# Altium PCB Digit_output_Ext.PcbDoc
Units mm, origin at the board's own origin, x right, y up, seen from the top; angles counter-clockwise.
Board outline 30 x 35 mm, 2 copper layers (Top Layer, Bottom Layer); 31 components, 13 nets, 68 pads, 22 vias.
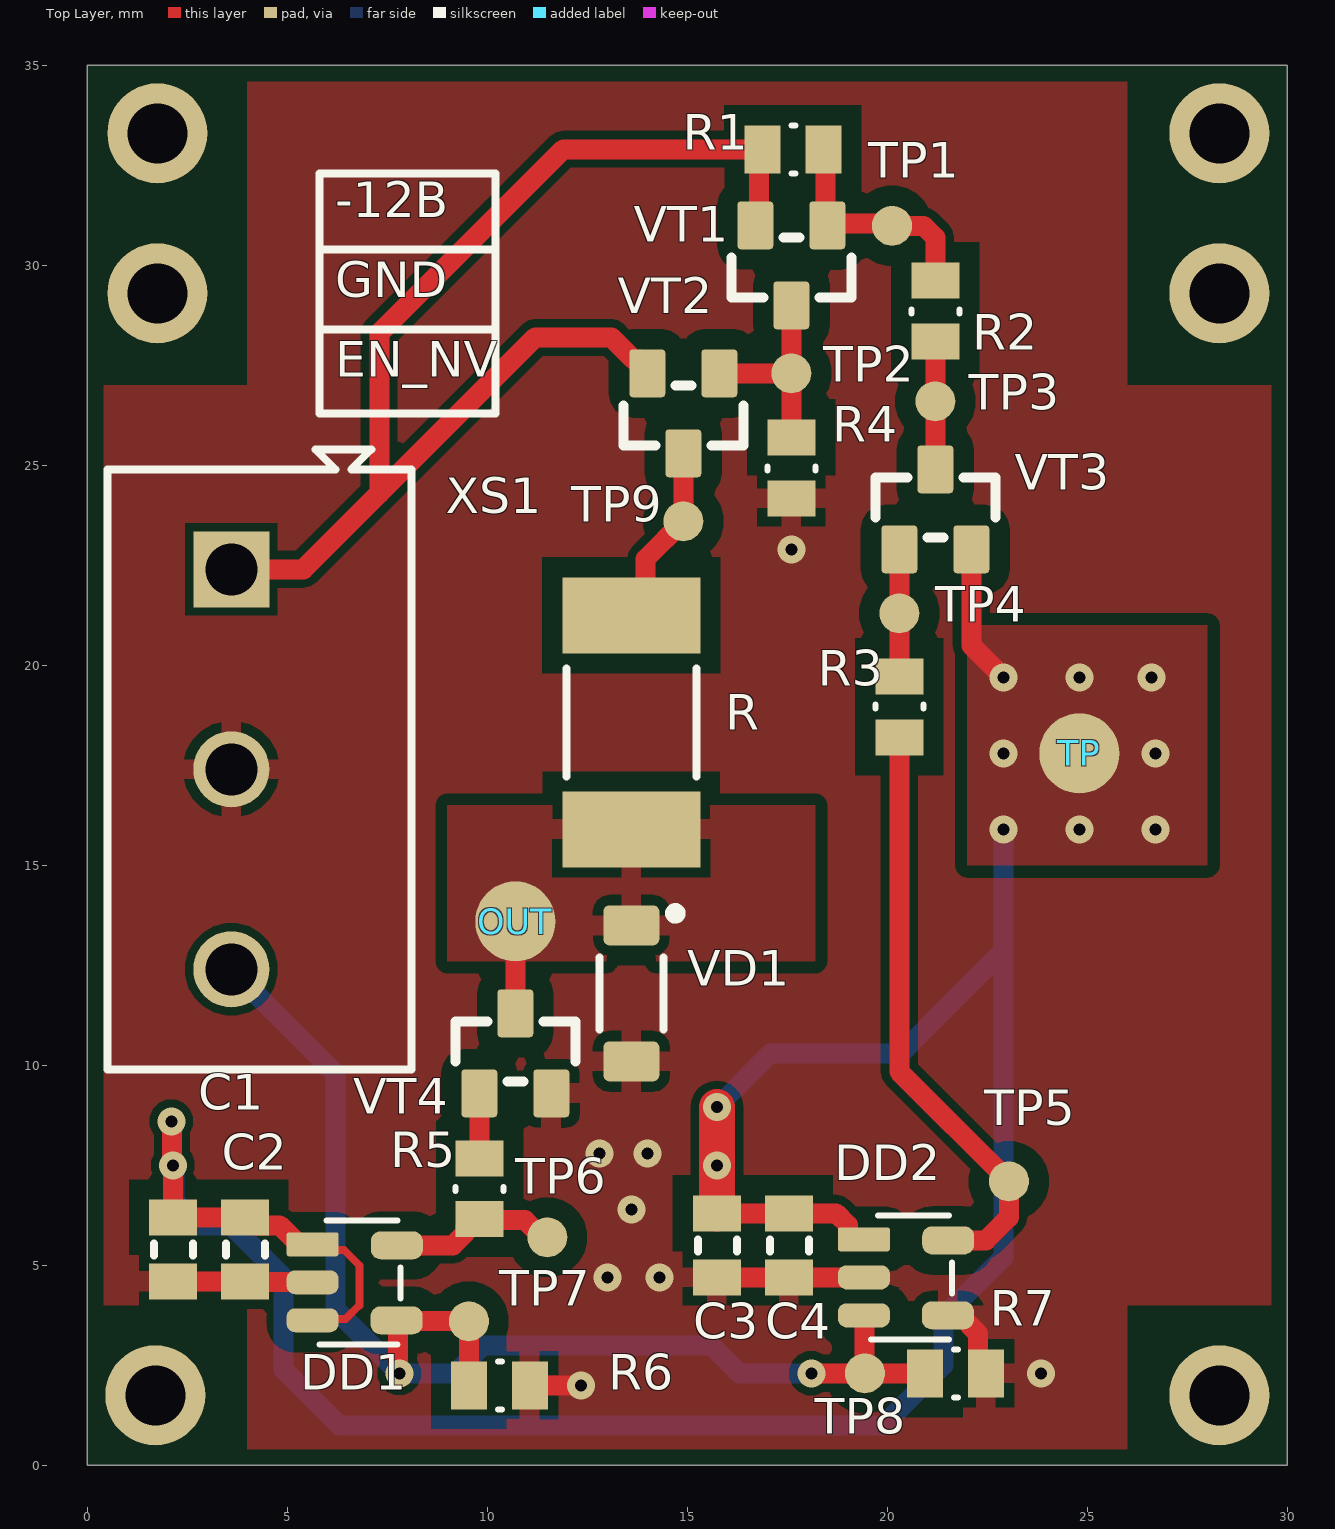
[diagram p0: Top Layer view]
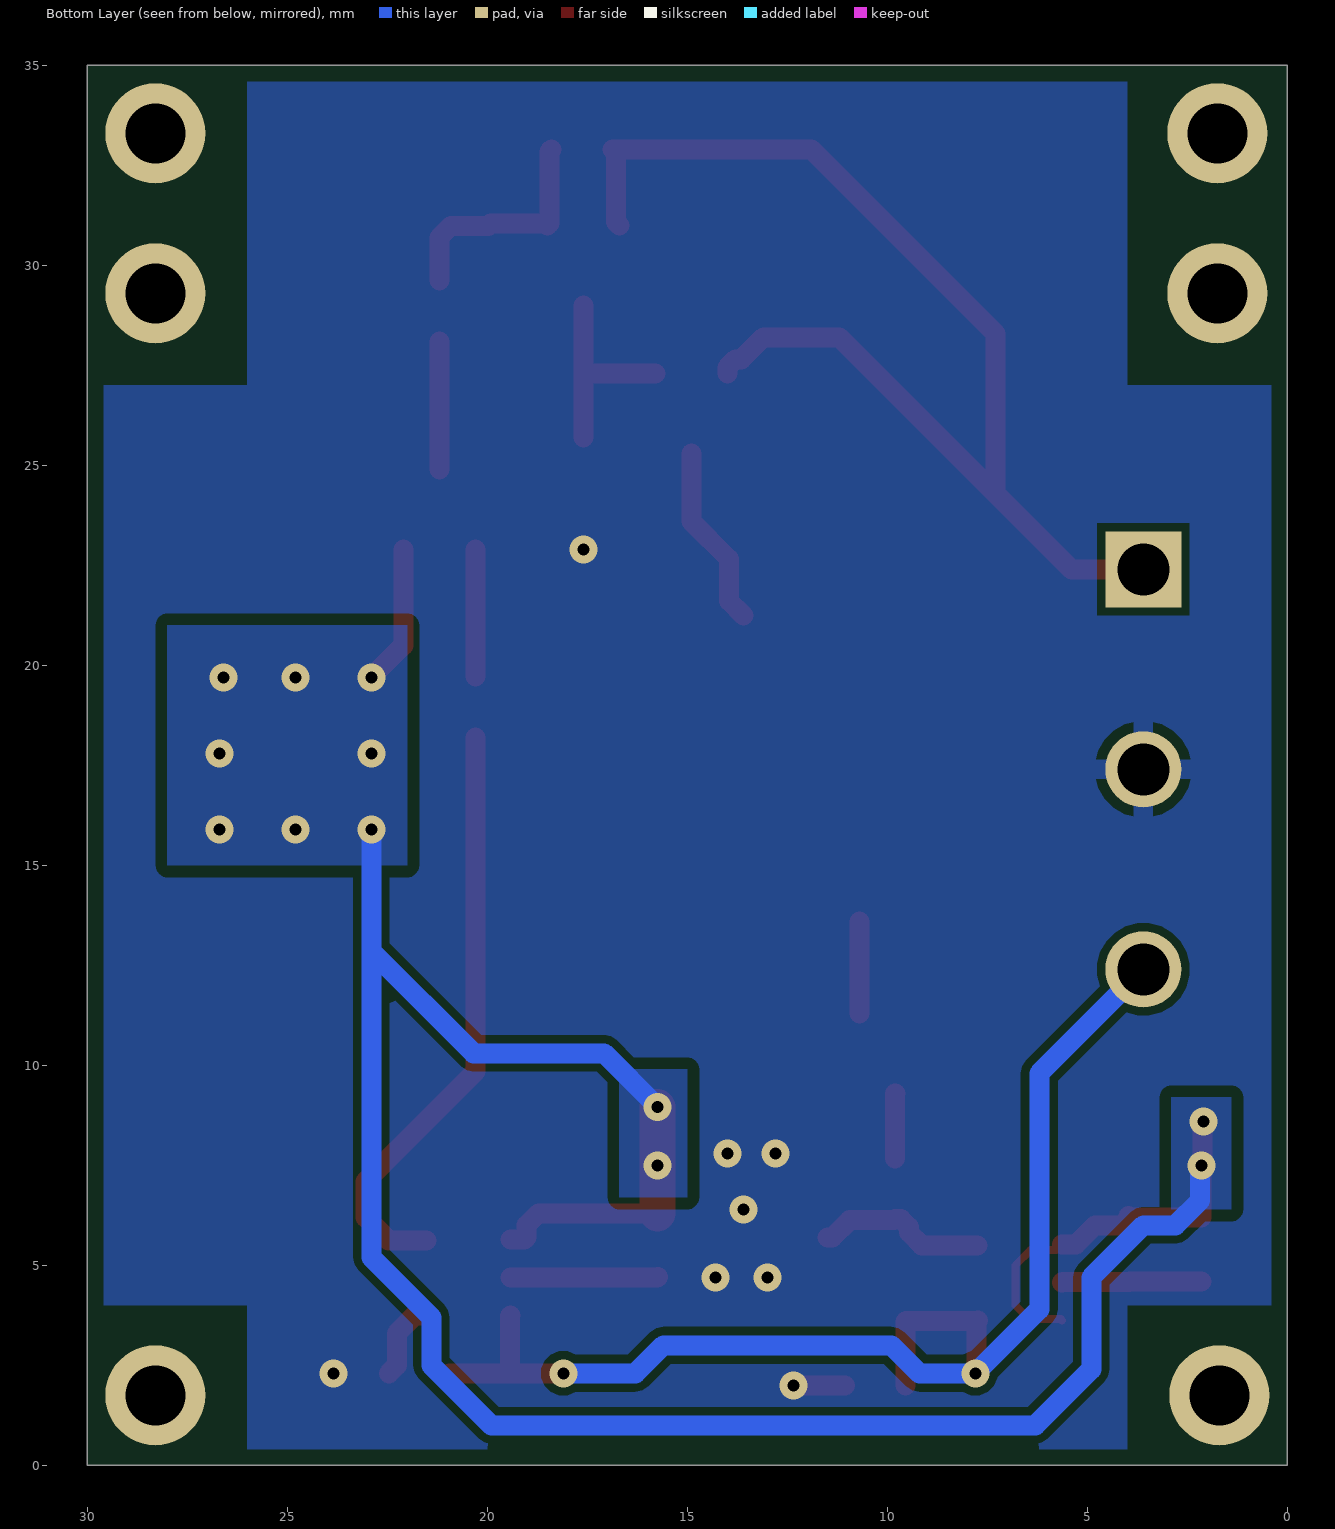
[diagram p1: Bottom Layer view, seen from below]
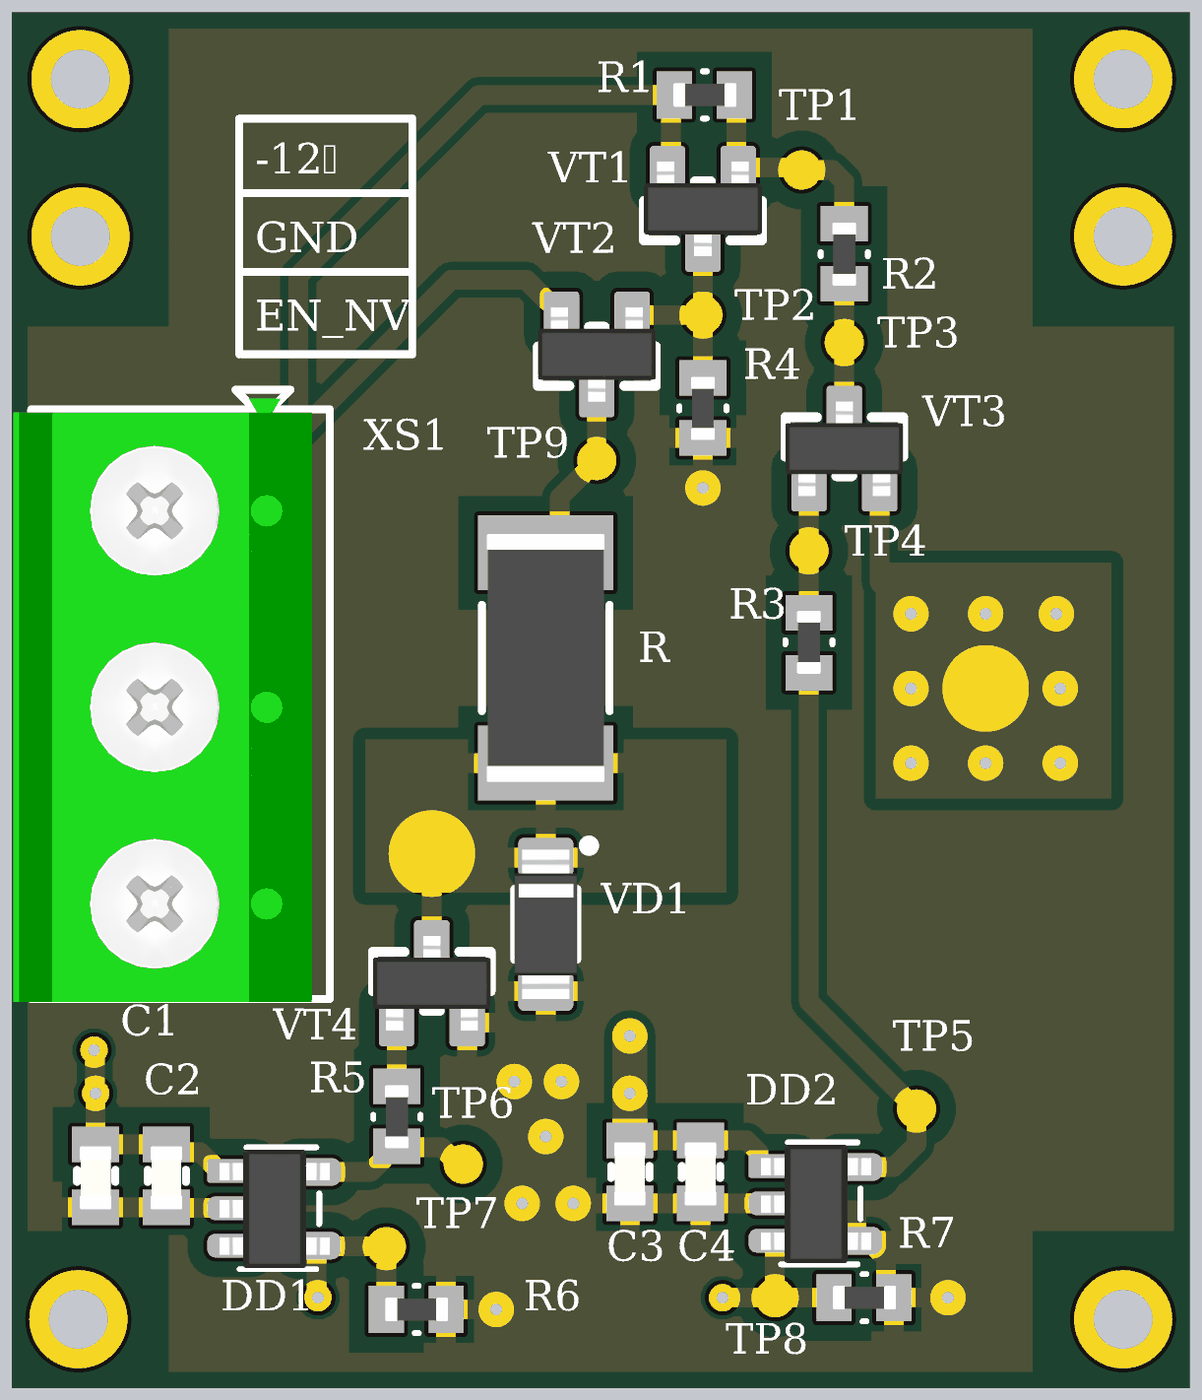
[diagram p2: 3D render of the assembled board from above, using the file's embedded part models]

## Layer stack, top to bottom
Top Solder: solder mask 0.0102, Solder Resist, Dk 3.5
Top Layer: signal copper 0.0356
Dielectric 1: dielectric 0.32, FR-4, Dk 4.8
Bottom Layer: signal copper 0.0356
Bottom Solder: solder mask 0.0102, Solder Resist, Dk 3.5

## Board outline
0,0 30,0 30,35 0,35

## Design rules (kind name [scope] priority, off if disabled: settings)
BoardOutlineClearance [All] p1: gap=0.4 ignorepadtopadclearanceinfootprint=FALSE except(0: Arc-SplitContinuation Track-SplitContinuation SMDPad-SplitContinuation THPad-SplitContinuation Via-SplitContinuation Fill-SplitContinuation Poly-SplitContinuation Region-SplitContinuation Text-SplitContinuation)
Clearance [All] p1: gap=0.254 ignorepadtopadclearanceinfootprint=FALSE except(0: Arc-SMDPad Arc-THPad Arc-Via Arc-Hole Track-SMDPad Track-THPad Track-Via Track-Hole SMDPad-Via SMDPad-Hole THPad-Hole Via-Hole Fill-Hole Poly-Hole Region-Hole Text-Hole; 0.2: Arc-Fill Arc-Poly Arc-Region Track-Fill Track-Poly Track-Region THPad-Fill THPad-Poly THPad-Region Via-Fill Via-Poly Via-Region; 0.3: Fill-Fill Fill-Poly Fill-Region Poly-Poly Poly-Region Region-Region; 0.5: SMDPad-Fill SMDPad-Poly SMDPad-Region)
Height [All] p1: minheight=0 maxheight=70 prefheight=35
MinimumAnnularRing [All] p1: minimumring=0.2
PolygonConnect Polygon_Direct_Connect [(IsVia and (InNet('12В') or InNet('-12В') or InNet('GND'))) or (IsPad and (InComponent('OUT') or InComponent('TP')))] p1: connectstyle=Direct reliefconductorwidth=0.254 reliefentries=4 polygonreliefangle="90 Angle" airgapwidth=0.254
PolygonConnect Polygon_Connect_Def [All] p2: connectstyle=Relief reliefconductorwidth=0.5 reliefentries=4 polygonreliefangle="90 Angle" airgapwidth=0.254
RoutingVias [All] p1: holewidth=0.3 width=0.7 viastyle="Through Hole" minholewidth=0.3 minwidth=0.7 maxholewidth=3 maxwidth=5
SolderMaskExpansion [All] p1: expansion=0.102 istentingtop=FALSE
SupplyNets "Schematic Supply Nets_2" [InNet('GND')] p1: voltage=0.000
SupplyNets "Schematic Supply Nets_1" [InNet('-12В')] p2: voltage=0.000
SupplyNets "Schematic Supply Nets" [InNet('12В')] p3: voltage=0.000
Width [All] p1: maxlimit=2.5 minlimit=0.15 preferedwidth=0.8
29 further rules are at their usual default settings.

## Components (designator, comment, footprint, x,y, rotation, side; value= is the part's Value field where it differs from the comment)
C1 "0.1 мкФ" "CAP 0603 3D" 2.14,6.2 r0 top
C2 "0.1 мкФ" "CAP 0603 3D" 3.94,6.2 r0 top
C3 "0.1 мкФ" "CAP 0603 3D" 15.74,6.3 r0 top
C4 "0.1 мкФ" "CAP 0603 3D" 17.54,6.3 r0 top
DD1 "UCC27517DBVR" SOT-23-5 5.657,5.525 r0 top
DD2 "UCC27517DBVR" SOT-23-5 19.44,5.65 r0 top
OUT "TP" Test_Point_2mm 10.7,13.6 r0 top
R "1.2 кОм" "Res_2512 3D" 13.65,15.925 r180 top
R1 "100 кОм" "Res_0603 3D" 18.4,32.9 r270 top
R2 "100 кОм" "Res_0603 3D" 21.2,28.1 r180 top
R3 "100 кОм" "Res_0603 3D" 20.3,19.724 r0 top
R4 "100 кОм" "Res_0603 3D" 17.6,24.176 r180 top
R5 "100 Ом" "Res_0603 3D" 9.81,6.152 r180 top
R6 "10 кОм" "Res_0603 3D" 11.064,2 r270 top
R7 "10 кОм" "Res_0603 3D" 22.464,2.3 r270 top
TP "TP" Test_Point_2mm 24.8,17.8 r0 top
TP1 "TP" Test_Point_1mm 20.118,30.989 r0 top
TP2 "TP" Test_Point_1mm 17.6,27.3 r0 top
TP3 "TP" Test_Point_1mm 21.2,26.6 r0 top
TP4 "TP" Test_Point_1mm 20.3,21.3 r0 top
TP5 "TP" Test_Point_1mm 23.04,7.1 r0 top
TP6 "TP" Test_Point_1mm 11.5,5.7 r0 top
TP7 "TP" Test_Point_1mm 9.54,3.6 r0 top
TP8 "TP" Test_Point_1mm 19.44,2.3 r0 top
TP9 "TP" Test_Point_1mm 14.9,23.6 r0 top
VD1 "BAT54GWX" SOD-123f 13.6,13.5 r0 top
VT1 "MMBT2222A" SOT-23-3 18.5,31 r180 top
VT2 "IRLML0060TRPBF" SOT-23-3 15.8,27.3 r180 top
VT3 "MMBT2907ALT1G" SOT-23-3 20.3,22.9 r0 top
VT4 "IRLML0060TRPBF" SOT-23-3 9.8,9.3 r0 top
XS1 "KF-301-3P" Degson_DG301-5.0-03P-1X 3.6,22.4 r270 top

## Footprints (in the part's own frame and the unit in brackets; to place one, negate y for a bottom-side part, rotate by r counter-clockwise, add the part's x,y. Pads: shape width x height; smd on the part's side, far side on the other; paste and mask are expansions set on the pad)
"CAP 0603 3D" [mm] "Конденсатор керамический ЧИП (SMD)"
  rect 1.2x0.9 smd: 1(0,0) 2(0,-1.6)
  silkscreen extent -0.48,-0.95 0.5,-0.65, body extent -0.4,-1.65 0.4,-0.05, height 0.86
Degson_DG301-5.0-03P-1X [mm]
  round 1.9 hole 1.3 mask+0.102: 1(10,0) 2(5,0)
  rect 1.9x1.9 hole 1.3 mask+0.102: 3(0,0)
  silkscreen extent -3,-3.1 12.5,4.5, body extent -2.77,-3.56 12.58,4.04, height 10.72
"Res_0603 3D" [mm] "Резистор ЧИП (SMD)"
  rect 1.2x0.9 smd: 1(0,0) 2(0,-1.524)
  silkscreen extent -0.6,-0.8 0.6,-0.7, body extent -0.3,-1.55 0.3,0.05, height 0.63
"Res_2512 3D" [mm] "Резистор ЧИП (SMD)"
  rect 3.45x1.9 smd: 1(0.05,0.025) 2(0.05,-5.325)
  silkscreen extent -1.58,-4 1.67,-1.3, body extent -1.45,-5.8 1.55,0.5, height 0.7
SOD-123f [mm]
  rrect30% 1.4x1 smd: 1(0,0) 2(0,-3.4)
  silkscreen extent -0.8,-2.6 1.23,0.43, body extent -0.8,-3.6 0.8,0.2, height 1.15
SOT-23-3 [mm] "TO-236AB    SuperSOT-3   SOT-346   KT-46   SC-59   SMT3"
  rrect20% 0.9x1.2 smd: 1(0,0) 2(0.9,2) 3(1.8,0)
  silkscreen extent -0.6,0.3 2.4,1.8, body extent -0.6,-0.2 2.4,2.2, height 1
SOT-23-5 [mm]
  rrect20% 1.3x0.6 smd: 1(-0.025,0)
  rrect70% 1.3x0.6 smd: 2(-0.025,-0.95) 3(-0.025,-1.9)
  rrect70% 1.3x0.7 smd: 4(2.075,-1.9) 5(2.083,-0.025)
  silkscreen extent 0.15,-2.5 2.17,0.6, body extent -0.36,-2.47 2.44,0.53, height 1
Test_Point_1mm [mm]
  round 1 smd paste-0.5: 1(0,0)
  body extent -0.5,-0.5 0.5,0.5, height 0.03
Test_Point_2mm [mm]
  round 2 smd paste-1: 1(0,0)
  body extent -1,-1 1,1, height 0.03

## Part data
C1 C2 C3 C4: library part C, "GRM1885C2A101JA01D"
DD1 DD2: library part UCC27517
R: library part R, "RC0603FR-071K2L"
R1 R2 R3 R4: library part R, "RC0603FR-07100KL"
R5: library part R, "RC0603FR-07100RL"
R6 R7: library part R, "RC0603FR-0710KL"
VD1: library part "Диод Шот. х1"
VT1: library part "VT NPN"
VT2 VT4: library part "VT MOSFET-N"
VT3: library part "VT PNP"

## Free pads (board coordinates)
  round 2.5 hole 1.5: 1(1.7,1.752) 1(1.752,29.3) 1(1.752,33.3) 1(28.3,1.752) 1(28.3,29.3) 1(28.3,33.3)

## Via types
v1: diameter 0.7, hole 0.3, Top Layer to Bottom Layer, 22 vias

## Nets (pads, with @x,y where several pads share a name; then routed paths per layer and width w, separated by ;. In a path a pad name is that pad's centre, name@x,y a point inside that pad or via, vN(x,y) a via of type N, cw(c..) or ccw(c..) an arc to the next point about the centre after c; other vN are vias at no path point)
12В: C1.1 C2.1 C3.1 C4.1 DD1.1 DD1.3 DD2.1 TP.1 VT3.3 | length 67.5
  Top Layer w0.2: DD1.3 5.661,3.654 6.454,3.654 6.8,4 6.8,5 6.423,5.377 5.781,5.377 DD1.1
  Top Layer w0.5: v1(2.1,8.6) 2.12,8.58 2.12,7.52 v1(2.14,7.5) C1.1 C2.1 ; C2.1@3.97,6.23 C2.1 ; DD1.1 5.282,5.525 4.808,6 4.14,6 C2.1 ; C3.1 C4.1 18.722,6.3 19.015,6.007 19.015,5.7 19.065,5.65 DD2.1 ; VT3.3 22.1,20.5 v1(22.9,19.7)
  Top Layer w0.9: C3.1 v1(15.74,7.5) v1(15.74,8.96)
  Bottom Layer w0.5: v1(2.14,7.5) 2.178,7.462 2.178,6.622 2.8,6 3.6,6 4.9,4.7 4.9,2.4 6.3,1 19.9,1 21.4,2.5 21.4,3.7 22.9,5.2 22.9,12.86 ; v1(15.74,7.5) v1@15.778,7.538 ; v1(15.74,8.96) 17.08,10.3 20.34,10.3 22.9,12.86 ; v1(22.9,15.9) 22.9,12.86
  other v1: 24.8,15.9 26.7,15.9 22.9,17.8 26.7,17.8 24.8,19.7 26.6,19.7
-12В: R1.2 VT1.3 VT2.3 XS1.3 | length 30.7
  Top Layer w0.5: XS1.3 5.4,22.4 7.3,24.3 ; VT2.3 14,27.45 13.8,27.65 13.65,27.65 13.1,28.2 11.2,28.2 7.3,24.3 ; VT1.3 16.788,31.088 16.788,32.812 R1.2 11.9,32.9 7.3,28.3 7.3,24.3
EN_NV: DD1.4 DD2.3 R6.2 R7.2 TP7.1 TP8.1 XS1.1 | length 31.8
  Top Layer w0.5: DD1.4 DD1.4@7.745,3.613 ; v1(7.8,2.3) 7.766,2.334 7.766,3.592 DD1.4@7.745,3.613 ; R6.2 TP7.1 9.527,3.613 DD1.4@7.745,3.613 ; v1(18.1,2.3) TP8.1 ; DD2.3 19.427,3.737 19.427,2.313 TP8.1 ; R7.2 TP8.1
  Bottom Layer w0.5: XS1.1 6.2,9.8 6.2,3.9 v1(7.8,2.3) 9.2,2.3 9.9,3 15.6,3 16.3,2.3 v1(18.1,2.3)
GND: C1.2 C2.2 C3.2 C4.2 DD1.2 DD2.2 DD2.4 R4.1 R6.1 R7.1 VD1.2 VT4.3 XS1.2 | length 10.5
  Top Layer w0.5: C1.2 C2.2 3.952,4.588 5.62,4.588 DD1.2 ; R6.1 v1(12.34,2) ; C3.2@15.729,4.711 C3.2 C4.2 DD2.2 ; DD2.4 21.815,3.75 22.264,3.3 22.264,2.5 R7.1
  other v1: 23.84,2.3 13,4.7 14.3,4.7 13.6,6.4 12.8,7.8 14,7.8 17.6,22.9
NetDD1_5: DD1.5 R5.1 TP6.1 | length 4.3
  Top Layer w0.5: DD1.5 9.14,5.5 9.46,5.82 9.46,5.952 9.66,6.152 R5.1 9.833,6.13 10.94,6.13 11.37,5.7 TP6.1
NetDD2_5: DD2.5 R3.2 TP5.1 | length 14.9
  Top Layer w0.5: R3.2 20.3,9.84 TP5.1 23.04,6.2 22.465,5.625 DD2.5
NetOUT_1: OUT.1 R.1 VD1.1 VT4.2 | length 2.3
  Top Layer w0.5: VT4.2 OUT.1
NetR1_1: R1.1 R2.2 TP1.1 VT1.1 | length 5.9
  Top Layer w0.5: R1.1 18.45,32.85 18.45,31.05 VT1.1 18.55,31.05 19.915,31.05 19.976,30.989 20.907,30.989 21.2,30.696 R2.2
NetR2_1: R2.1 TP3.1 VT3.2 | length 3.2
  Top Layer w0.5: VT3.2 TP3.1 R2.1
NetR3_1: R3.1 TP4.1 VT3.1 | length 3.2
  Top Layer w0.5: R3.1 TP4.1 VT3.1
NetR4_2: R4.2 TP2.1 VT1.2 VT2.1 | length 5.1
  Top Layer w0.5: VT2.1 TP2.1 ; R4.2 TP2.1 ; VT1.2 TP2.1
NetR5_2: R5.2 VT4.1 | length 1.6
  Top Layer w0.5: VT4.1 9.805,9.295 9.805,7.681 R5.2
NetR_2: R.2 TP9.1 VT2.2 | length 4.6
  Top Layer w0.5: R.2 13.957,21.607 13.957,22.657 TP9.1 VT2.2

## Polygon pours and split planes (outlines as drawn)
GND on Bottom Layer "NONET_L04_P-001" (solid, pour order 12): 4,35 4,27 0,27 0,4 4,4 4,0 26,0 26,4 30,4 30,27 26,27 26,35
12В on Bottom Layer "NONET_L04_P-001" (solid, pour order 11): 1.4,9.2 2.9,9.2 2.9,6.4 1.4,6.4
12В on Bottom Layer "NONET_L04_P-001" (solid, pour order 10): 15,6.7 16.7,6.7 16.7,9.9 15,9.9
12В on Bottom Layer "NONET_L04_P-001" (solid, pour order 8): 22,15 22,21 28,21 28,15
GND on Top Layer "NONET_L04_P-001" (solid, pour order 9): 0,27 4,27 4,35 26,35 26,27 30,27 30,4 26,4 26,0 4,0 4,4 0,4
NetOUT_1 on Top Layer "NONET_L04_P-001" (solid, pour order 6): 9,12.6 9,16.5 18.2,16.5 18.2,12.6
12В on Top Layer "NONET_L04_P-001" (solid, pour order 7): 22,15 22,21 28,21 28,15

## Silkscreen, mask and mechanical layers (free items; w line width, h text height)
Top Overlay:
  lines w0.2: 5.8,28.4 10.1,28.4 ; 5.8,30.4 10.2,30.4 ; 5.8,26.3 10.2,26.3 10.2,32.3 5.8,32.3 5.8,26.3
  text "-12В" at 6.2,30.9 h1.52
  text "GND" at 6.2,28.9 h1.52
  text "EN_NV" at 6.2,26.911 h1.52
Рамка:
  the board outline again, w0.2